# Altium PCB BOARD_2LAYER.PcbDoc (part 5 of 7)
Units mil, origin at the board's own origin, x right, y up, seen from the top; angles counter-clockwise.
Board outline 9842.52 x 9842.52 mil, 2 copper layers (Top Layer, Bottom Layer), stack 34.252 mil thick; 276 components, 129 nets, 793 pads, 303 vias.
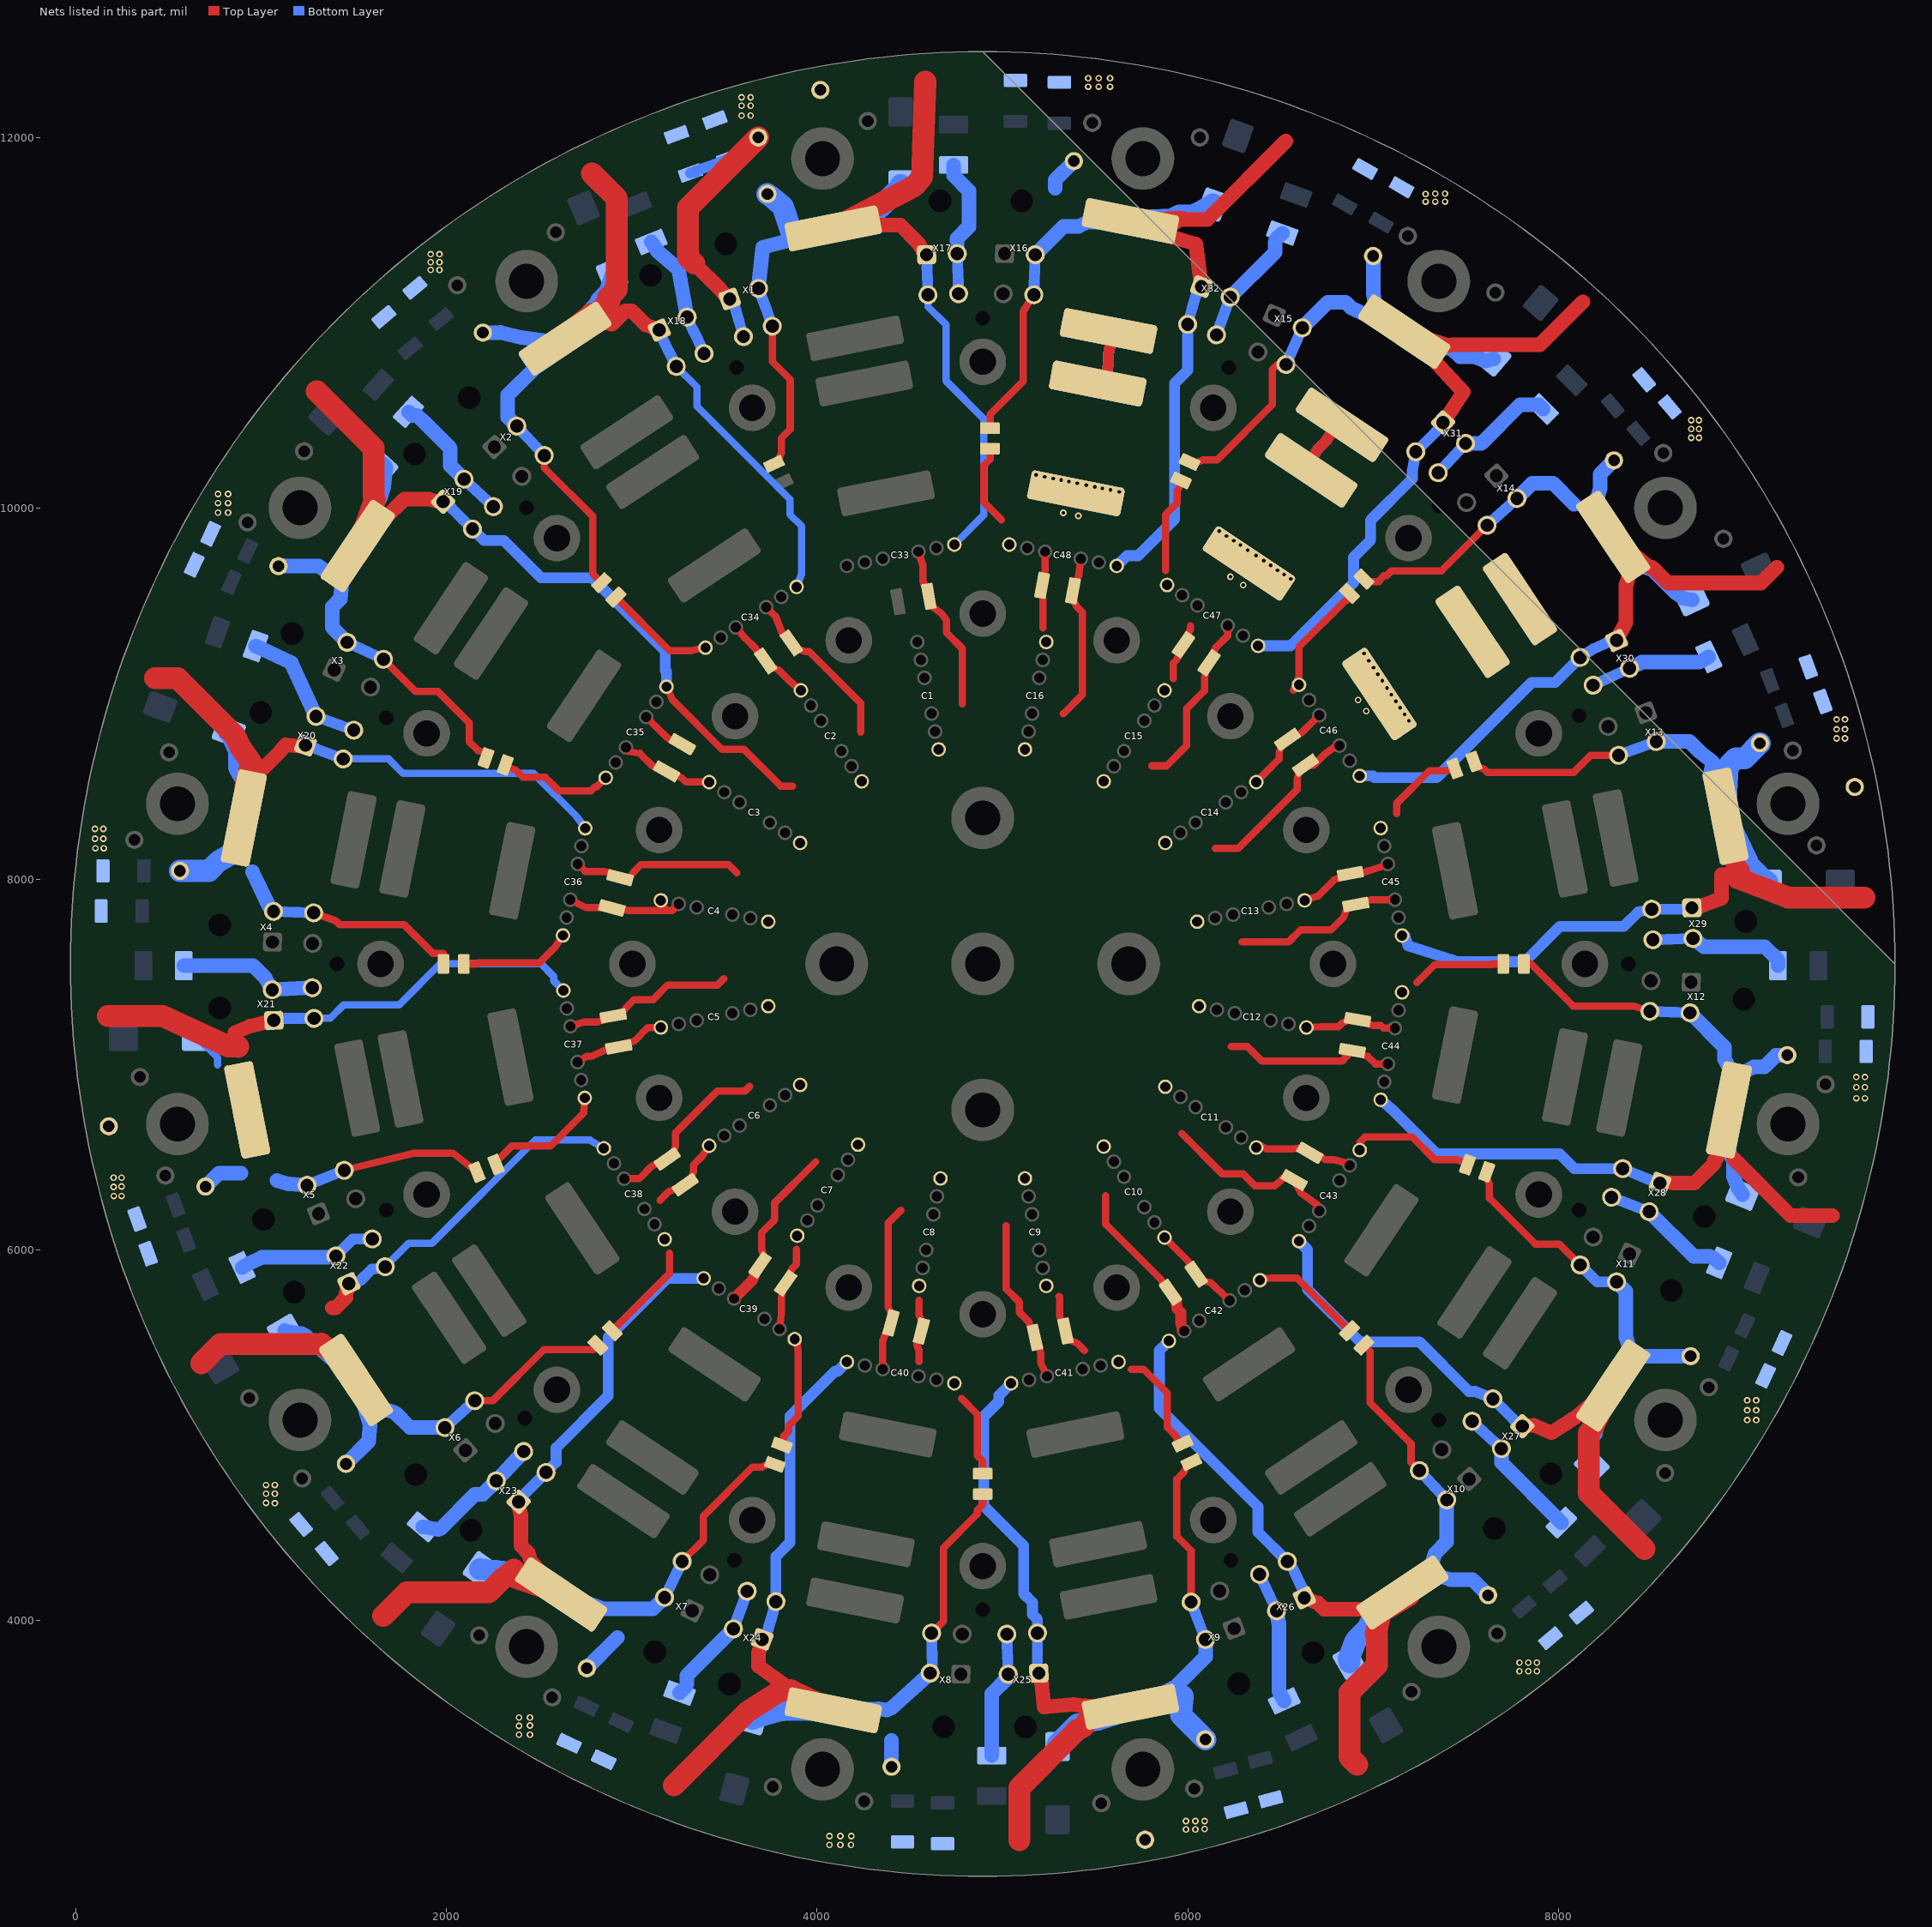
[diagram p5: the nets of this part, all layers, seen from the top]

## Via types
v1: diameter 35.43/35.43 (per signal layer), hole 19.68, Top Layer to Bottom Layer, 303 vias

## Nets (pads, with @x,y where several pads share a name; then routed paths per layer and width w, separated by ;. In a path a pad name is that pad's centre, name@x,y a point inside that pad or via, vN(x,y) a via of type N, cw(c..) or ccw(c..) an arc to the next point about the centre after c; other vN are vias at no path point) (continued)
$1N5582: L54.2 L55.1 | length 1238
  Top Layer w9.84: v1(6975.68,9179.13) 6975.68,9150.59 6984.54,9141.73 v1(7001.27,9141.73) ; v1(7048.51,9070.87) 7028.33,9050.68 7023.83,9046.19 7023.83,9009.11 L55.1@7033.49,8999.45 ; L55.1@7081.21,8841.54 7104.18,8841.54 7104.18,8928.76 L55.1@7033.49,8999.45 ; v1(7144.97,8925.2) L55.1@7144.97,8938.92 ; v1(7168.59,8889.76) L55.1@7192.21,8889.76 ; v1(7192.21,8854.33) L55.1@7192.21,8889.76 ; L55.1@7033.49,8999.45 7070.57,8999.45 7085.84,8984.18 v1(7097.72,8996.06) ; v1(7097.72,8996.06) 7116.23,8996.06 L55.1@7136.51,8975.79 ; v1(7097.72,8996.06) 7097.72,8984.25 v1(7121.35,8960.63) L55.1@7136.51,8975.79 ; L55.1@7136.51,8975.79 7136.51,8947.38 L55.1@7144.97,8938.92 ; L55.1@7144.97,8938.92 7192.21,8891.68 L55.1@7192.21,8889.76
  Bottom Layer w9.84: v1(6950.09,9218.5) 6989.46,9179.13 v1(6975.68,9179.13) ; v1(7001.27,9141.73) 7001.27,9113.19 7008.16,9106.3 v1(7024.89,9106.3) 7024.89,9079.47 7033.49,9070.87 v1(7048.51,9070.87) ; L54.2@7033.49,8999.45 L54.2@7070.6,8999.45 ; v1(7074.1,9031.5) 7074.1,9002.95 L54.2@7070.6,8999.45 ; v1(7097.72,8996.06) L54.2@7097.72,8999.45 ; v1(7192.21,8854.33) 7192.21,8889.76 v1(7168.59,8889.76) 7168.59,8925.2 v1(7144.97,8925.2) 7144.97,8960.63 v1(7121.35,8960.63) 7121.35,8989.17 7111.07,8999.45 L54.2@7097.72,8999.45 ; L54.2@7070.6,8999.45 L54.2@7097.72,8999.45
  other v1: 6961.9,8907.48 6918.59,8966.54
$1N5583: L55.2 L56.1
$1N5612: L57.2 L58.1 | length 313.4
  Bottom Layer w59.06: L58.1@6665.2,10205.97 6664.71,10265.44 6703.68,10323.77 6745.39,10365.48 6784.37,10423.82 L57.2@6831.42,10451.51
$1N5613: L58.2 L59.1 | length 1143
  Top Layer w9.84: v1(6207.96,9852.36) 6240.44,9819.88 v1(6247.33,9826.77) ; v1(6282.76,9803.15) 6274.82,9795.2 6274.82,9758.12 L59.1@6308.28,9724.66 ; v1(6322.13,9775.59) 6308.28,9761.74 L59.1@6308.28,9724.66 ; v1(6367.41,9746.06) 6338.87,9746.06 6329.46,9736.65 L59.1@6329.46,9703.48 ; v1(6446.15,9692.91) L59.1@6435.58,9703.48 ; v1(6483.55,9667.32) 6463.37,9687.51 6463.37,9696.52 6456.41,9703.48 L59.1@6435.58,9703.48 ; L59.1@6308.28,9724.66 L59.1@6329.46,9703.48 ; L59.1@6329.46,9703.48 6366.54,9703.48 6380.13,9689.89 v1(6408.75,9718.5) 6423.03,9704.23 6434.84,9704.23 L59.1@6435.58,9703.48
  Bottom Layer w9.84: L58.2@6158.75,9885.83 6166.62,9877.95 v1(6168.59,9877.95) 6176.46,9877.95 6202.05,9852.36 v1(6207.96,9852.36) ; v1(6282.76,9803.15) 6282.76,9805.12 6284.73,9807.09 6265.05,9826.77 v1(6247.33,9826.77) 6245.29,9824.73 6245.29,9787.65 L58.2@6308.28,9724.66 ; v1(6322.13,9775.59) 6308.28,9761.74 L58.2@6308.28,9724.66 ; v1(6367.41,9746.06) 6338.87,9746.06 6331.41,9738.61 6329.46,9736.65 L58.2@6329.46,9703.48 ; v1(6446.15,9692.91) L58.2@6435.58,9703.48 ; v1(6483.55,9667.32) 6463.37,9687.51 6463.37,9696.52 6456.41,9703.48 L58.2@6435.58,9703.48 ; L58.2@6308.28,9724.66 L58.2@6329.46,9703.48 ; L58.2@6329.46,9703.48 6366.54,9703.48 6380.13,9689.89 6388.56,9698.32 v1(6408.75,9718.5) 6423.03,9704.23 6434.84,9704.23 L58.2@6435.58,9703.48
  other v1: 6298.51,9586.61 6554.42,9620.08 6229.61,9631.89 6518.98,9643.7
$1N5614: L59.2 L60.1 | length 313.4
  Top Layer w59.06: L59.2@6665.2,10205.97 6664.71,10265.44 6703.68,10323.77 6745.39,10365.48 6784.37,10423.82 L60.1@6831.42,10451.51
$1N5643: L61.2 L62.1 | length 308
  Bottom Layer w59.06: L62.1@5512.97,10674.31 5558.55,10715.38 5572.24,10784.19 5572.24,10835.91 5585.93,10904.72 L61.2@5572.24,10957.58
$1N5644: L62.2 L63.1 | length 1121.1
  Top Layer w9.84: v1(5180.4,10181.1) 5180.4,10152.56 5227.65,10105.32 v1(5227.65,10171.26) ; v1(5272.92,10161.42) 5272.92,10132.87 5258.37,10118.33 5295.11,10081.59 5316.23,10081.59 v1(5316.23,10153.54) ; v1(5402.84,10135.83) 5402.84,10107.82 5395.07,10100.05 L63.1@5395.07,10081.59 5421.3,10107.82 5538.67,10107.82 v1(5538.67,10108.27)
  Bottom Layer w9.84: L62.2@5172.53,10187.01 5178.43,10181.1 v1(5180.4,10181.1) ; v1(5227.65,10171.26) 5216.54,10160.16 5272.92,10103.78 v1(5272.92,10161.42) ; v1(5316.23,10153.54) 5316.23,10107.82 5342.45,10081.59 L62.2@5395.07,10081.59 5421.3,10107.82 5452.05,10107.82 v1(5452.05,10125.98) 5461.9,10116.14 v1(5497.33,10116.14) ; v1(5357.57,10145.67) 5385.23,10145.67 5395.07,10135.83 v1(5402.84,10135.83) ; v1(5581.98,10100.39) 5581.98,10081.59 5591.72,10081.59 5600.68,10090.55 v1(5629.22,10090.55)
  other v1: 5408.75,9960.63 5328.04,9976.38
$1N5645: L63.2 L64.1 | length 308
  Top Layer w59.06: L63.2@5512.97,10674.31 5558.55,10715.38 5572.24,10784.19 5572.24,10835.91 5585.93,10904.72 L64.1@5572.24,10957.58
$1N5703: C2.2 C18.1 C34.2 R18.2 | length 1102.3
  Top Layer w39.37: R18.2@2914.26,9522.05 3202.13,9234.18 3321.02,9234.18 C34.2@3397.49,9249.34 ; 3561.16,9358.7 3561.16,9358.14 3572.22,9347.09 3611.18,9301.15 3667.92,9244.42 3700.68,9197.64 3724.78,9178.31 3724.3,9177.83 C18.1@3721.3,9177.83 3760.28,9142.69 3792.38,9128.93 3852.2,9069.11 C2.2@3912.02,9019.13
$1N5742: C3.2 C19.1 C35.2 R19.2 | length 1139.2
  Top Layer w39.37: R19.2@2316.84,8616.98 2325.69,8606.88 2373.22,8589.58 2412.82,8549.98 2534.36,8549.98 2606.59,8477.75 2779.38,8477.75 2799.23,8497.6 2808.68,8497.6 C35.2@2858.87,8547.79 ; 2968.24,8711.47 2968.24,8703.7 2983.55,8688.38 3043.08,8679.16 3109.3,8612.94 3124.03,8604.44 C19.1@3187.29,8582.21 3236.67,8565.45 3271.3,8545.45 3292.47,8524.28 C3.2@3417.17,8524.28
$1N5781: C4.2 C20.1 C36.2 R20.2 | length 1288.6
  Top Layer w39.37: R20.2@2093.79,7543.31 2161.49,7543.31 2167.73,7549.55 2502.42,7549.55 2585.05,7632.18 C36.2@2628.14,7697.13 ; 2668.23,7889.86 2676.89,7889.86 2686.73,7880.02 2751.73,7847.27 2840.3,7847.27 C20.1@2892.75,7845.4 2944.25,7840.02 2978.14,7830.94 3190.18,7830.94 ; C4.2@3156.55,7886.35 3156.55,7866.02 3190.18,7832.39 3190.18,7830.94 ; 3253.08,7867.14 3216.88,7830.94 3190.18,7830.94
$1N5819: C5.2 C21.1 C37.2 R21.2 | length 1197.6
  Top Layer w39.37: R21.2@2266.94,6461.59 2266.94,6494.26 2266.1,6495.09 2287.13,6495.09 2324.5,6532.46 2352.34,6560.3 2561.07,6560.3 2739.55,6738.79 2739.55,6742.94 C37.2@2745.88,6820.63 ; 2707.48,7013.7 2707.08,7013.31 2705.37,7013.31 2757.05,7044.24 2772.04,7044.24 2788.78,7047.19 2850.61,7076.09 2879.98,7081.27 C21.1@2929.35,7095.77 2977.67,7116.25 3014.07,7127.62 3086.71,7200.27 C5.2@3156.55,7200.27
$1N5825: C6.2 C22.1 C38.2 R22.2 | length 964.1
  Top Layer w39.37: R22.2@2894.57,5564.56 3202.13,5872.12 3202.13,5983.32 ; 3152.41,6268.17 3198.78,6314.54 3239.36,6332.23 C22.1@3288.01,6351.92 3323.15,6390.9 3333.8,6426.1 3333.8,6460.17 3372.26,6498.62 C6.2@3417.17,6562.33
$1N5831: C7.2 C23.1 C39.2 R23.2 | length 1082.7
  Top Layer w39.37: 3796.83,5573.71 3805.92,5651.13 3805.92,5737.68 3810.76,5772.88 C23.1@3830.45,5821.53 3850.14,5870.17 3867.83,5903.95 3887.02,5923.15 3887.02,6003.01 ; R23.2@3809.49,4947.46 3819.33,4957.31 3819.33,4996.68 3820.58,4996.68 3846.73,5022.83 3846.73,5053.06 3896.69,5103.02 3896.69,5451.34 3888.51,5528.87 C39.2@3878.67,5519.02
$1N5838: C8.2 C24.1 C40.2 R24.2 | length 800.2
  Top Layer w39.37: 4549.63,5397.28 4549.63,5457.26 4537.54,5492.15 4552.92,5542.32 4559.15,5548.56 4559.15,5555.7 4562.97,5559.51 4562.97,5564.34 C24.1@4561.38,5562.74 4563.24,5615.18 4549.96,5648.4 4549.96,5728.9 ; 4778.34,5199.43 4863.47,5114.3 4863.47,4891.31 4893,4861.78 R24.2@4893,4793.31
$1N5964: C9.2 C25.1 C41.2 R25.2 | length 907.4
  Top Layer w39.37: 5304.51,5750.55 5307.47,5747.59 5307.47,5647.93 5317.82,5610.45 C25.1@5339.97,5562.87 5362.12,5515.3 5401.3,5498.42 5442.52,5457.2 ; 5695.43,5355.83 5761.98,5355.83 5889.2,5228.61 5889.2,5042.55 5934.31,4997.44 5952.16,4959.17 R25.2@5972.07,4955.47
$1N5970: C10.2 C26.1 C42.2 R26.2 | length 1120.7
  Top Layer w39.37: C10.2@5873.98,6067.48 5998.62,5942.83 6019.05,5913.67 C26.1@6045.01,5869.42 6083.99,5834.28 6124.22,5823.62 6157.18,5790.66 6214.76,5738.11 6224.84,5728.03 6224.84,5727.91 ; C42.2@6388.51,5837.27 6378.67,5847.12 6450.73,5848.19 6588.12,5848.19 R26.2@6871.74,5564.56
$1N5976: C11.2 C27.1 C43.2 R27.2 | length 1238.4
  Top Layer w39.37: C11.2@6368.83,6552.49 6378.67,6562.33 6378.67,6570.95 6423.11,6545.28 6562.86,6545.28 6597.75,6549.31 6647.92,6533.94 C27.1@6657.76,6524.09 6707.14,6507.33 6741.77,6487.34 6787.4,6487.34 6862.6,6466.82 6872.44,6456.98 ; C43.2@6927.12,6538.82 6927.12,6581.38 6954.96,6609.22 7210.31,6609.22 7332.34,6487.2 7452.15,6487.2 7499.68,6469.9 R27.2@7508.53,6459.8
$1N5983: C12.2 C28.1 C44.2 R28.2 | length 1011.2
  Top Layer w39.37: C12.2@6639.29,7200.27 6717.12,7204.72 6812.72,7204.72 6830.73,7222.74 6863.16,7240.1 C28.1@6915.57,7242.81 6963.89,7222.34 7000.29,7210.96 7041.26,7210.96 7055.3,7196.93 7116.93,7196.93 ; 7234.12,7442.02 7332.84,7540.74 7642.4,7540.74 7644.97,7543.31 R28.2@7702.05,7543.31
$1N6109: C13.2 C29.1 C45.2 R29.2 | length 960.9
  Top Layer w39.37: C13.2@6629.45,7886.35 6703.61,7910.36 6791.61,7998.36 6828.01,8009.74 C29.1@6876.33,8030.21 6881.77,8030.21 6881.77,8026.39 6933.85,8032.82 6967.26,8043.52 7088.36,8082.75 ; 7126.36,8353.49 7126.36,8409.53 7301.4,8584.57 7397.92,8584.57 7413.91,8590.38 R29.2@7439.63,8597.29
$1N6115: C14.2 C30.1 C46.2 R30.2 | length 1199.8
  Top Layer w39.37: C14.2@6368.83,8524.28 6423.05,8580.29 6491.57,8648.81 6491.57,8680.2 6502.22,8715.4 C30.1@6537.36,8754.38 6586.01,8774.07 6617.48,8794.07 6623.75,8800.34 6678.87,8855.46 6708.4,8884.99 ; C46.2@6599.03,9048.66 6569.5,9019.13 6597.96,9091.71 6597.96,9252.21 6847.11,9501.36 6851.16,9501.36 6872.27,9522.47 6872.27,9541.21 R30.2@6871.74,9541.73
$1N6121: C15.2 C31.1 C47.2 R31.2 | length 824.8
  Top Layer w39.37: 5879.46,9666.45 5879.46,9967.04 5941.73,10029.31 5941.73,10091.59 5963.11,10137.43 R31.2@5962.23,10150.83 ; 5920.06,9081.94 5920.06,9164.87 5937.85,9182.66 5955.55,9216.44 C31.1@5975.24,9265.09 5994.93,9313.73 6012.62,9347.51 6012.62,9367.27 6013.15,9367.8
$1N6128: C16.2 C32.1 C48.2 R32.2 | length 849.9
  Top Layer w39.37: R32.2@4932.37,10322.83 4932.37,10265.75 4899.85,10233.22 4899.85,10033.1 4994.08,9938.86 ; 5217.76,9355.54 5217.76,9500.73 5215.9,9533.16 C32.1@5213.18,9585.56 5226.19,9650.19 5229.14,9666.94 5229.54,9767.23
$1N6933: R33.2 R34.2 TP17.1 X1.1 X1.3 | length 1785.3
  Top Layer w78.74: 3337.8,11321.03 3476.19,11182.64 3513.19,11137.58 X1.1@3528.28,11130.55
  Top Layer w118.11: 3337.8,11321.03 3302.37,11356.46 3302.37,11621.97 TP17.1@3682.37,12001.97
  Bottom Layer w59.06: R33.2@3316.53,11809.8 3349.28,11817.54 3340.74,11819.44 3443.78,11855.46 3483.9,11870.07 R34.2@3523.22,11888.54 3562.4,11907.4 3638.41,11932.39 TP17.1@3682.37,12001.97 ; X1.1@3528.28,11130.55 3554.2,11090.8 3560.02,11074.81 3576.83,11016.44 X1.3@3602.34,10927.07
D_CH-1: L1.1 R1.1 R17.1 TP1.1 X1.2 X1.4 | length 2622.1
  Top Layer w39.37: X1.4@3757.72,10983.63 3757.72,10792.5 3854.38,10695.84 3854.38,10427.74 3806.14,10379.49 3806.14,10300.14 3792.66,10265.69 R17.1@3767.34,10240.9
  Bottom Layer w59.06: X1.2@3683.66,11187.1 3725.69,11078.29 X1.4@3757.72,10983.63
  Bottom Layer w78.74: X1.2@3683.66,11187.1 3683.66,11196.94 3707.28,11409.06 L1.1@4102.34,11512.14 ; L1.1@4086.02,11510.93 L1.1@4095.4,11510.93
  Bottom Layer w118.11: TP1.1@3731.58,11696.85 3751.56,11682.14 3815.97,11628.21 3820.52,11610.92 3867.62,11471.03 4095.4,11510.93 4095.96,11511.02 4102.34,11512.14 4261.13,11556.92 4347.51,11631.68 4450.09,11734.25 R1.1@4450.09,11746.06
D_CH-2: L5.1 R2.1 R18.1 TP2.1 X2.2 X2.4 | length 2535.4
  Top Layer w39.37: X2.4@2527.3,10286.26 2527.3,10220.27 2788.36,9959.21 2788.36,9647.94 R18.1@2836.31,9600
  Bottom Layer w59.06: X2.2@2379.63,10444.62 2485.02,10331.61 X2.4@2527.3,10286.26
  Bottom Layer w78.74: TP2.1@2196.15,10948.82 2290.64,10948.82 2291.3,10949.48 2404.72,10922.53 2583.84,10897.48 L5.1@2638.51,10914.63 ; X2.2@2379.63,10444.62 2330.74,10493.51 2330.74,10612.04 2374.61,10655.9 2440.36,10721.65 2480.35,10761.65 L5.1@2638.51,10914.63 ; R2.1@2893.14,11259.74 2863.13,11174.05 2852.05,11162.77 2814.75,11125.48 2808,11108.48 L5.1@2638.51,10914.63
D_CH-3: L9.1 R3.1 R19.1 TP3.1 X3.2 X3.4 | length 2322.9
  Top Layer w39.37: X3.4@1659.92,9186.66 1833.8,9012.78 1953.8,9012.78 2123.27,8843.31 2123.27,8741.92 2169.99,8695.2 2210.15,8680.58 R19.1@2213.25,8654.68
  Bottom Layer w59.06: X3.2@1463.67,9278.17 X3.4@1659.92,9186.66
  Bottom Layer w78.74: TP3.1@1093.79,9688.98 1310.83,9688.98 1373.63,9647.01 L9.1@1521.68,9797.8 1434.1,9595.93 1426.91,9512.79 1383.47,9469.35 1383.47,9358.37 X3.2@1463.67,9278.17
  Bottom Layer w118.11: 1623.56,10062.33 1642.02,10119.79 1652.4,10211.43 1652.4,10217.77 R3.1@1643.62,10226.55
D_CH-4: L13.1 R4.1 R20.1 TP4.1 X4.2 X4.4 | length 2306.5
  Top Layer w39.37: X4.4@1283.61,7819.01 1403.67,7775.78 1424.28,7755.17 1771.68,7755.17 1926.46,7600.39 1983.55,7600.39 R20.1@1983.55,7543.31
  Bottom Layer w59.06: X4.2@1067.21,7826.56 X4.4@1283.61,7819.01
  Bottom Layer w78.74: 953.67,8040.2 1045.3,7848.47 X4.2@1067.21,7826.56
  Bottom Layer w118.11: TP4.1@562.29,8045.28 718.65,8045.28 771.18,8097.8 848.03,8141.41 L13.1@905.7,8330.6 924.82,8527.47 881.22,8604.32 881.22,8696.15 841.79,8780.8 R4.1@826.01,8794.88
D_CH-5: L17.1 R5.1 R21.1 TP5.1 X5.2 X5.4 | length 1560.3
  Top Layer w39.37: X5.4@1448.63,6430.21 1822.32,6522.19 2036.24,6522.19 R21.1@2164.73,6420.3
  Bottom Layer w39.37: R5.1@650.87,7139.76 662.68,7139.76 766.33,7036.12 766.33,6998.24
  Bottom Layer w59.06: X5.2@1247.86,6349.09 X5.4@1448.63,6430.21
  Bottom Layer w78.74: TP5.1@700.09,6342.52 772.49,6414.92 890.57,6414.92 ; 1086.42,6374.12 1149.4,6356.1 X5.2@1247.86,6349.09
D_CH-6: L21.1 R6.1 R22.1 TP6.1 X6.2 X6.4 | length 2582.4
  Top Layer w39.37: X6.4@2152.39,5187.04 2249.95,5187.04 2526.22,5463.31 2793.31,5463.31 R22.1@2816.62,5486.62
  Bottom Layer w9.84: L21.1@1511.84,5298.66 1511.84,5298.55 1511.04,5297.75 1511.23,5297.75 1512.53,5296.45 L21.1@1521.95,5288.21
  Bottom Layer w59.06: X6.2@1991.47,5042.15 X6.4@2152.39,5187.04
  Bottom Layer w78.74: R6.1@1126.47,5564.96 1216.65,5548.23 1234.76,5541.12 1300.99,5474.9 1318.04,5468.28 L21.1@1511.84,5298.66 ; TP6.1@1457.96,4846.46 1581.33,4969.83 1583.94,5003.52 1588.09,5055.92 L21.1@1512.53,5296.45 ; L21.1@1521.95,5288.21 1664.82,5140.5 1722.69,5122.42 1802.97,5042.15 X6.2@1991.47,5042.15
D_CH-7: L25.1 R7.1 R23.1 TP7.1 X7.2 X7.4 | length 2311.7
  Top Layer w39.37: X7.4@3271.66,4320.56 3386.95,4435.85 3386.95,4564.78 3651.59,4829.42 3702.46,4829.42 3736.35,4844.25 R23.1@3771.79,4843.88
  Bottom Layer w59.06: X7.2@3176.74,4125.94 X7.4@3271.66,4320.56
  Bottom Layer w78.74: L25.1@2609.09,4149.24 2848.47,4063.97 3114.77,4063.97 X7.2@3176.74,4125.94 ; TP7.1@2757.17,3744.09 2921.86,3908.79
  Bottom Layer w118.11: R7.1@2181.11,4279.36 2249.79,4269.41 2266.57,4268.34 2346.06,4259.66 2352.76,4252.95 2369.57,4245.74 2609.09,4149.24 2615.88,4142.46 L25.1@2618.83,4142.46
D_CH-8: L29.1 R8.1 R24.1 TP8.1 X8.2 X8.4 | length 2279.5
  Top Layer w39.37: X8.4@4617.3,3933.92 4681.03,3997.65 4681.03,4392.98 4863.47,4575.42 4863.47,4596.46 4893,4625.98 R24.1@4893,4683.07
  Bottom Layer w59.06: X8.2@4609.74,3717.52 4621.56,3729.34 4621.56,3746.05 X8.4@4617.3,3933.92
  Bottom Layer w78.74: L29.1@4071.87,3519.8 4328.95,3525.67 4375.05,3518.2 4403.68,3531.22 X8.2@4609.74,3717.52 ; TP8.1@4400.87,3212.6 4400.87,3354.8
  Bottom Layer w118.11: R8.1@3654.58,3471.64 3724.83,3495.76 3797.87,3515.15 3813.77,3517.7 4071.87,3519.8 4082.85,3519.8 L29.1@4086.02,3516.63
D_CH-9: L33.1 R9.1 R25.1 TP9.1 X9.2 X9.4 | length 2676.3
  Top Layer w39.37: X9.4@6017.17,4100.98 6017.17,4378.17 5940.17,4455.17 5940.17,4763 5976.67,4799.5 5993.34,4830.76 R25.1@6018.66,4855.56
  Bottom Layer w59.06: X9.4@6017.17,4100.98 X9.2@6094.77,3898.82
  Bottom Layer w78.74: L33.1@5703.85,3527.27 5933.11,3644.53 5944.61,3655.32 6094.77,3805.48 X9.2@6094.77,3898.82
  Bottom Layer w118.11: R9.1@5296.54,3320.87 5296.54,3332.68 5404.79,3440.93 5515.43,3467.14 L33.1@5703.85,3527.27 ; L33.1@5690.14,3536.32 5690.14,3526.48 5699.98,3526.48 5700.78,3527.27 L33.1@5703.85,3527.27 ; TP9.1@6093.79,3360.24 5962.87,3491.15 5973.06,3592.59 L33.1@5703.85,3527.27
D_CH-10: L37.1 R10.1 R26.1 TP10.1 X10.2 X10.4 | length 2619.6
  Top Layer w39.37: R26.1@6949.69,5486.62 6983.96,5452.35 6983.96,5175.18 7203.8,4955.34 7203.8,4855.25 X10.4@7248.85,4810.2
  Bottom Layer w59.06: X10.4@7248.85,4810.2 X10.2@7396.53,4651.83
  Bottom Layer w78.74: X10.2@7396.53,4651.83 7396.53,4426.11 7333.57,4363.15 7315.49,4305.28 L37.1@7157.33,4152.3 7359.19,4239.88 7417.06,4221.8 7535.37,4221.8 TP10.1@7619.38,4137.8
  Bottom Layer w118.11: R10.1@6871.35,3776.78 6868.31,3797.71 6905.66,3893.97 6967.11,3955.43 7004.6,4026.62 L37.1@7157.33,4152.3
D_CH-11: L41.1 R11.1 R27.1 TP11.1 X11.2 X11.4 | length 2562.3
  Top Layer w39.37: R27.1@7612.12,6422.09 7611.75,6386.66 7626.58,6352.77 7626.58,6280.21 7874.03,6032.76 8003.12,6032.76 X11.4@8116.23,5919.64
  Bottom Layer w59.06: X11.4@8116.23,5919.64 8207.75,5828.13 X11.2@8312.48,5828.13
  Bottom Layer w78.74: R11.1@8179,4838.01 8179,4988.12 8199.07,5008.19 8199.07,5009.4 8206.27,5067.27 L41.1@8293.85,5269.13 ; X11.2@8312.48,5828.13 8363.34,5777.27 8363.34,5528.86 8381.42,5470.99 L41.1@8293.85,5269.13 ; TP11.1@8711.9,5427.17 8504.7,5427.17 8446.83,5427.29 L41.1@8293.85,5269.13
D_CH-12: L45.1 R12.1 R28.1 TP12.1 X12.2 X12.4 | length 2565.7
  Top Layer w39.37: R28.1@7812.29,7543.31 7851.22,7543.31 8077.94,7316.59 8405.2,7316.59 X12.4@8492.54,7287.29
  Bottom Layer w59.06: X12.4@8492.54,7287.29 X12.2@8708.95,7279.74
  Bottom Layer w78.74: X12.2@8708.95,7279.74 8895.2,7093.48 8895.2,7029.73 8923.34,6976.02 L45.1@8919.67,6756.01 ; R12.1@8991.98,6298.15 8965.82,6338.4 8944.15,6395.78 8944.15,6482.3 8916.01,6536 L45.1@8919.67,6756.01 ; TP12.1@9233.55,7051.18 9173.24,7051.18 9110.87,6988.81 9054.19,6988.81 9000.49,6960.67 L45.1@8919.67,6756.01
D_CH-13: L49.1 R13.1 R29.1 TP13.1 X13.2 X13.4 | length 2667.1
  Top Layer w39.37: R29.1@7543.22,8634.99 7565.71,8607.61 7599.6,8592.78 7616.5,8575.88 8080.87,8575.88 8173.73,8668.74 X13.4@8323.48,8668.74
  Bottom Layer w9.84: L49.1@8816.23,8550.65 8806.64,8560.25 8814.19,8560.25 L49.1@8818.26,8564.31
  Bottom Layer w59.06: X13.4@8323.48,8668.74 X13.2@8526.95,8742.8
  Bottom Layer w78.74: X13.2@8526.95,8742.8 8706.12,8742.8 8761.8,8687.13 8831.6,8630.87 8816.23,8550.65 8815.71,8547.91 L49.1@8899.19,8344.32
  Bottom Layer w118.11: L49.1@8899.99,8340.45 8899.19,8341.24 L49.1@8899.19,8344.32 ; TP13.1@9085.91,8734.25 9005.18,8653.52 8955.83,8653.52 8920.48,8618.17 8913.06,8601.45 L49.1@8899.19,8344.32 ; R13.1@9125.28,7986.22 9113.47,7986.22 9018.71,8080.98 9018.71,8095.03 9011.36,8111.8 L49.1@8899.19,8344.32
D_CH-14: L53.1 R14.1 R30.1 TP14.1 X14.2 X14.4 | length 2430.1
  Top Layer w39.37: R30.1@6949.69,9619.68 6965,9604.37 7031.87,9604.37 7031.87,9611.39 7057.3,9636.81 7071.15,9636.81 7098.28,9663.94 7368.45,9663.94 X14.4@7613.93,9909.42
  Bottom Layer w59.06: X14.4@7613.93,9909.42 X14.2@7774.84,10054.31
  Bottom Layer w78.74: X14.2@7774.84,10054.31 7857.83,10137.29 7968.95,10137.29 8083,10023.25 ; TP14.1@8298.51,10259.84 8224.35,10185.68 8224.35,10106.74 8206.27,10048.87 L53.1@8293.85,9847.01 8446.83,9688.85 8504.7,9670.77 8626.27,9549.2 8673.22,9515.68 R14.1@8720.5,9507.36
D_CH-15: L57.1 R15.1 R31.1 TP15.1 X15.2 X15.4 | length 2711.6
  Top Layer w39.37: R31.1@6008.81,10250.74 6044.08,10247.28 6079.88,10262.11 6157.83,10262.11 6454.71,10558.99 6454.71,10749.07 6482.55,10776.91 X15.4@6528.82,10776.91
  Bottom Layer w59.06: X15.4@6528.82,10776.91 X15.2@6616.9,10974.73
  Bottom Layer w78.74: X15.2@6616.9,10974.73 6754.17,11112 6850.85,11112 6878.71,11084.14 6965.31,11041.57 L57.1@7167.17,10954 ; TP15.1@6999.3,11362.2 6999.3,11164.85 7009.01,11106.98 7076.63,11041.57 L57.1@7167.17,10954 ; R15.1@7650.32,10807.87 7603.96,10795.43 7544.05,10819.05 7467.08,10819.05 7426.9,10859.22 7369.03,10866.42 L57.1@7167.17,10954
D_CH-16: L61.1 R16.1 R32.1 TP16.1 X16.2 X16.4 | length 2269.6
  Top Layer w39.37: R32.1@4932.37,10433.07 4932.37,10507.83 5111.49,10686.95 5111.49,11063.27 X16.4@5168.7,11152.69
  Bottom Layer w59.06: X16.4@5168.7,11152.69 X16.2@5176.26,11369.1
  Bottom Layer w78.74: X16.2@5176.26,11369.1 5328.89,11521.73 5410.26,11521.73 5452.22,11542.39 5683.66,11551.51 5688.92,11551.51 L61.1@5690.14,11550.3 ; 5282.89,11728.54 5282.89,11771.78 TP16.1@5385.13,11874.02
  Bottom Layer w118.11: L61.1@5683.66,11551.51 5915.1,11560.63 5957.06,11581.29 6032.67,11581.29 6038.51,11587.13 6055.21,11593.83 R16.1@6134.73,11639.82
OUT_CH-1: L65.2 X17.2 X17.4 | length 755.3
  Bottom Layer w59.06: X17.2@4755.31,11374.87 X17.4@4762.87,11158.46
  Bottom Layer w78.74: L65.2@4735.52,11853.35 4735.52,11796.49 4818.2,11713.82 4818.2,11520.39 4755.31,11457.51 X17.2@4755.31,11374.87
OUT_CH-2: L66.2 X18.2 X18.4 | length 689
  Bottom Layer w59.06: X18.2@3298.16,11032.67 3328.9,10965.54 3348.62,10927.48 X18.4@3389.67,10836.42
  Bottom Layer w78.74: L66.2@3104.1,11438.43 3140.64,11385.24 3251.49,11290.51 X18.2@3298.16,11032.67
OUT_CH-3: L67.2 X19.2 X19.4 | length 720.8
  Bottom Layer w59.06: X19.2@2094.61,10157.93 X19.4@2252.98,10010.25
  Bottom Layer w78.74: L67.2@1795.06,10521.38 1814.74,10501.7 1839.54,10502.83 1873.02,10472.69 2021.12,10324.59 2021.12,10231.42 X19.2@2094.61,10157.93
OUT_CH-4: L68.2 X20.2 X20.4 | length 747.5
  Bottom Layer w59.06: X20.2@1295.92,8878.5 X20.4@1499.39,8804.44
  Bottom Layer w78.74: L68.2@970.07,9257.91 1162.09,9167.71 1163.68,9166.17 X20.2@1295.92,8878.5
OUT_CH-5: L69.2 X21.2 X21.4 | length 757.6
  Bottom Layer w78.74: L69.2@582.96,7533.46 956.78,7533.46 1022.41,7467.84 X21.2@1060.08,7403.67 X21.4@1276.32,7415
OUT_CH-6: L70.2 X22.2 X22.4 | length 755.1
  Bottom Layer w59.06: X22.2@1403.64,5968.15 1495.15,6059.66 X22.4@1599.88,6059.66
  Bottom Layer w78.74: L70.2@897.53,5906.41 934.15,5927.93 1005.05,5961 1389.2,5961 X22.2@1403.64,5968.15
OUT_CH-7: L71.2 X23.2 X23.4 | length 720.9
  Bottom Layer w78.74: L71.2@1872.67,4506.92 1955.07,4492.37 1970.97,4499.27 2152.96,4681.27 2195.04,4681.27 X23.2@2268.54,4754.76 X23.4@2416.21,4913.13
OUT_CH-8: L72.2 X24.2 X24.4 | length 681.4
  Bottom Layer w59.06: X24.2@3547.96,3956.07 X24.4@3622.02,4159.54
  Bottom Layer w78.74: L72.2@3257.14,3610.54 3290.65,3643.34 3296.47,3659.32 3296.47,3704.57 X24.2@3547.96,3956.07
OUT_CH-9: L73.2 X25.2 X25.4 | length 692.3
  Bottom Layer w59.06: X25.4@5023.13,3928.15 X25.2@5030.69,3711.75
  Bottom Layer w78.74: L73.2@4942.21,3272.64 4942.21,3606.56 5030.69,3695.03 X25.2@5030.69,3711.75
OUT_CH-10: L74.2 X26.2 X26.4 | length 711.6
  Bottom Layer w59.06: X26.4@6386.49,4250.19 X26.2@6478,4053.94
  Bottom Layer w78.74: X26.2@6478,4053.94 6491.34,3980.74 6491.34,3619.55 6498.53,3604.14 L74.2@6520.06,3567.52
OUT_CH-11: L75.2 X27.2 X27.4 | length 749.1
  Bottom Layer w59.06: X27.4@7533.02,5076.36 X27.2@7691.39,4928.69
  Bottom Layer w78.74: X27.2@7691.39,4928.69 7691.39,4853.19 L75.2@8014.57,4530.01
OUT_CH-12: L76.2 X28.2 X28.4 | length 706.6
  Bottom Layer w59.06: X28.4@8285.92,6284.45 X28.2@8488.07,6206.85
  Bottom Layer w78.74: X28.2@8488.07,6206.85 8729.12,5965.8 8816.74,5965.8 8832.51,5959.43 L76.2@8866.51,5930.69
OUT_CH-13: L77.2 X29.2 X29.4 | length 751.4
  Bottom Layer w59.06: X29.4@8508.16,7673.44 X29.2@8724.56,7680.99
  Bottom Layer w78.74: X29.2@8724.56,7680.99 8783.83,7636.01 9112.31,7636.01 9183.35,7564.96 L77.2@9183.35,7533.46
OUT_CH-14: L78.2 X30.2 X30.4 | length 659.1
  Bottom Layer w59.06: X30.4@8186.12,9046.64 X30.2@8382.36,9138.15
  Bottom Layer w78.74: X30.2@8382.36,9138.15 8449.04,9171.18 8757.7,9171.18 8773.11,9178.37 L78.2@8809.73,9199.89
OUT_CH-15: L79.2 X31.2 X31.4 | length 730.1
  Bottom Layer w59.06: X31.4@7350.1,10193.17 X31.2@7497.78,10351.54
  Bottom Layer w78.74: X31.2@7497.78,10351.54 7583.99,10351.54 7791.65,10559.19 7893.87,10559.19 L79.2@7916.14,10536.92
OUT_CH-16: L80.2 X32.2 X32.4 | length 677.3
  Bottom Layer w59.06: X32.4@6154.13,10936.91 X32.2@6228.19,11140.39
  Bottom Layer w78.74: X32.2@6228.19,11140.39 6469.85,11382.05 6469.85,11437.14 6475.67,11453.12 L80.2@6509.18,11485.92
~OUT: C1.1 C2.1 C3.1 C4.1 C5.1 C6.1 C7.1 C8.1 C9.1 C10.1 C11.1 C12.1 C13.1 C14.1 C15.1 C16.1 C17.2 C18.2 C19.2 C20.2 C21.2 C22.2 C23.2 C24.2 C25.2 C26.2 C27.2 C28.2 C29.2 C30.2 C31.2 C32.2 C33.1 C34.1 C35.1 C36.1 C37.1 C38.1 C39.1 C40.1 C41.1 C42.1 C43.1 C44.1 C45.1 C46.1 C47.1 C48.1 L4.2 L8.2 L12.2 L16.2 L20.2 L24.2 L28.2 L32.2 L36.2 L40.2 L44.2 L48.2 L52.2 L56.2 L60.2 L64.2 R33.1 R34.1 R35.1 R36.1 R37.1 R38.1 R39.1 R40.1 R41.1 R42.1 R43.1 R44.1 R45.1 R46.1 R47.1 R48.1 R49.1 R50.1 R51.1 R52.1 R53.1 R54.1 R55.1 R56.1 R57.1 R58.1 R59.1 R60.1 R61.1 R62.1 R63.1 R64.1 TP49.1 TP50.1 TP51.1 TP52.1 X17.1 X17.3 X18.1 X18.3 X19.1 X19.3 X20.1 X20.3 X21.1 X21.3 X22.1 X22.3 X23.1 X23.3 X24.1 X24.3 X25.1 X25.3 X26.1 X26.3 X27.1 X27.3 X28.1 X28.3 X29.1 X29.3 X30.1 X30.3 X31.1 X31.3 X32.1 X32.3 | length 68637.6
  Top Layer w9.84: C27.2@6573.12,6377.48 6573.12,6344.42 6608.92,6308.62 ; L48.2@8914.1,6741.89 8913.18,6755.58 L48.2@8919.67,6756.01
  Top Layer w39.37: 2669.07,7206.77 2743.28,7230.64 2815.24,7230.64 2851.63,7242.02 C21.2@2899.95,7262.49 2948.28,7282.97 2971.32,7309.71 3012.51,7350.9 3115.03,7350.9 3193.42,7429.29 3462.13,7429.29 3497.15,7464.3 ; 2708.32,8082.58 2748.56,8042.34 2851.17,8042.34 2889.8,8031.99 C20.2@2936.56,8008.93 2989.01,8007.06 3008.06,8037.35 3050.06,8079.36 3522.03,8079.36 3565.72,8035.67 ; 2958.4,6384.99 3040.25,6384.99 3108.48,6453.21 3142.26,6470.91 C22.2@3190.91,6490.6 ; 3077.6,8875.14 3133.1,8820.4 3187.93,8765.57 3222.56,8745.58 C19.2@3271.94,8728.82 ; C35.1@3186.97,9038.82 3219.6,8968.02 3487.16,8700.46 3605.78,8700.46 3803.4,8502.84 3866.65,8502.84 ; 3636.06,6883.23 3610.43,6857.59 3460.89,6857.59 3236.7,6633.41 3236.7,6564.78 3226.05,6529.57 C22.2@3190.91,6490.6 ; C23.2@3691.77,5918.63 3711.46,5967.27 3700.81,6002.48 3700.81,6029.4 3699.89,6030.32 3699.89,6092.37 3770.15,6162.63 3770.15,6254.03 3992.92,6476.8 ; 3724.84,9468.07 3724.84,9477.91 3734.68,9477.91 3734.68,9458.79 3776.06,9417.4 3807.33,9334.3 3822.84,9315.15 3858.71,9271.36 C18.2@3859.98,9274.93 3898.95,9239.79 3934.16,9229.13 3955.6,9229.13 4233.9,8950.82 4233.9,8793.24 ; 4353.55,5357.78 4353.55,5510.28 4373.25,5560.2 C24.2@4397.85,5606.55 4399.72,5659 4382.86,5692.95 4382.86,6145.76 4451.45,6214.36 ; 4546.62,9767.23 4570.49,9693.03 4570.49,9611.23 4581.87,9574.83 C17.2@4602.34,9526.51 4622.82,9478.19 4627.55,9465.89 4627.55,9465.48 4669.15,9434.97 4698.31,9395.86 4698.31,9329.73 4783.36,9244.68 4783.36,8946.18 ; 5019.82,6132.07 5019.82,5790.36 5090.49,5719.7 5090.49,5664.12 5141.88,5612.73 5152.23,5575.25 C25.2@5174.38,5527.68 5196.52,5480.1 5206.88,5442.62 5206.88,5390.24 5239.38,5319.38 ; 5327.14,8892.05 5430.82,8995.73 5430.82,9440.49 5399.97,9471.33 5382.61,9503.76 C32.2@5379.9,9556.17 5400.38,9604.49 5411.75,9640.89 5411.75,9651.64 5422.6,9728.83 ; 5556.66,6291.92 5556.66,6139.14 5852.82,5842.98 5874.3,5812.31 C26.2@5906.34,5772.32 5910.83,5767.82 C26.2@5910.83,5766.46 ; 5804.59,8611.97 5884.86,8611.97 5993.01,8720.12 5993.01,8920.35 6089.39,9016.72 6089.39,9084.13 6094.22,9119.34 C31.2@6113.91,9167.98 6133.6,9216.63 6151.3,9250.41 6214.99,9314.11 6214.99,9368.55 ; 5966.38,6629.52 6184.95,6410.95 6297.09,6410.95 6360.67,6347.37 6468.16,6347.37 6471.37,6350.57 6488.51,6363.39 C27.2@6515.37,6390.24 ; 6147.66,8165.66 6270.53,8165.66 6588.67,8483.8 6588.67,8541.52 6599.32,8576.73 C30.2@6634.46,8615.7 6640.6,8621.84 6651.37,8621.84 6657.5,8615.7 6679.51,8615.7 6739.96,8676.16 6788.59,8711.71 6798.19,8721.31 6817.76,8721.31 ; 6232.72,7098.02 6320.43,7098.02 6399.13,7019.32 6832.23,7019.32 6859.36,7046.45 C28.2@6835.81,7073.48 ; 6292.13,7662.39 6543.58,7662.39 6607.64,7726.45 6770.55,7726.45 6840.05,7795.95 6857.41,7843.02 C29.2@6905.73,7863.49 6954.17,7883.29 6990.45,7889.69 7116.93,7889.69 ; 6708.4,6211.47 6698.55,6221.31 6698.44,6221.31 6698.2,6221.55 6698.2,6244.38 6608.92,6308.62 C27.2@6573.12,6377.48 ; 7078.52,7003.86 7011.27,7003.86 6970.89,7044.24 6934.5,7055.62 C28.2@6886.18,7076.09 6885.78,7075.69 C28.2@6878.56,7075.7 ; C22.2@3165.95,6465.64 C22.2@3190.91,6490.6 ; C22.2@3165.95,6465.64 C22.2@3190.91,6490.6 ; C22.2@3165.95,6465.64 3165.67,6465.36 3168.16,6465.36 C22.2@3190.91,6490.6 ; C27.2@6515.37,6390.24 C27.2@6516.14,6390.24 ; C27.2@6515.37,6390.24 C27.2@6515.86,6390.13 ; C27.2@6515.86,6390.13 C27.2@6516.14,6390.24 ; C27.2@6515.86,6390.13 C27.2@6573.12,6377.48 ; C27.2@6516.14,6390.24 C27.2@6522.94,6392.86 ; C27.2@6516.14,6390.24 6520.32,6390.24 C27.2@6522.94,6392.86 ; C27.2@6522.94,6392.86 C27.2@6573.12,6377.48 ; C28.2@6835.81,7073.48 6876.35,7073.48 C28.2@6878.56,7075.7 ; C28.2@6835.81,7073.48 6838.02,7075.7 C28.2@6878.56,7075.7
  Top Layer w59.06: 3551.32,5737.75 3652.08,5838.51 3669.66,5883.69 C23.2@3691.77,5918.63 ; C26.2@5910.83,5766.46 5935.9,5733.58 5940.98,5684.32 5961.92,5663.38 5961.92,5602.35 5969.87,5573.32 5979.32,5563.86
  Top Layer w78.74: 876.17,7096.84 860.08,7173.95 939.19,7206.93 X21.1@1068.73,7238.54 ; L16.2@905.7,8330.6 915.63,8503.09 1103.47,8690.93 1131.92,8726.07 1224.27,8716.08 1232.33,8716.08 X20.1@1239.36,8723.12 ; 1384.47,5688.34 1401.98,5688.34 1458.26,5744.63 1457.57,5760.47 X22.1@1473.52,5818.29 ; L24.2@1509.7,5319.2 1511.84,5319.2 L24.2@1511.84,5298.66 ; L12.2@1521.68,9797.8 1521.68,9800.75 1528.46,9807.53 1672.32,9951.38 1673.32,9951.38 1771.69,10049.75 1905.19,10049.75 1965.2,10036.41 X19.1@1981.84,10036.99 ; X23.1@2389.47,4641.99 2390.54,4611.44 2402.23,4565.34 2402.23,4404.21 2440.06,4366.38 2454.88,4322.06 2609.09,4149.24 2615.88,4142.46 L28.2@2618.83,4142.46 ; L8.2@2630.87,10925.92 2694.22,10925.92 L8.2@2740.77,10972.47 ; L8.2@2782.13,11048.19 2799.31,11031.01 L8.2@2740.77,10972.47 ; X24.1@3703.35,3899.51 3704.49,3886.57 3683,3827.52 3683,3755.57 L32.2@3863.87,3625.31 ; L32.2@4086.02,3516.63 4082.85,3519.8 L32.2@4071.87,3519.8 ; L4.2@4086.02,11510.93 4103.82,11528.73 4120.12,11528.73 4448.47,11528.73 4544.88,11432.32 4577.88,11380.45 X17.1@4590.06,11369.1 ; X25.1@5195.94,3717.52 5211.09,3658.68 5222.86,3535.15 5382.94,3548.56 5409.95,3544.33 5446.99,3541.78 L36.2@5703.85,3527.27 ; 5975.72,11562.9 L64.2@5951.98,11562.9 ; X32.1@6072.81,11196.94 6043.48,11427.22 5894.8,11469.49 L64.2@5690.14,11550.3 5946.85,11568.04 5932.81,11542.8 L64.2@5951.98,11562.9 ; 6527.55,11981.44 6104.6,11558.49 5956.4,11558.49 L64.2@5951.98,11562.9 ; X26.1@6627.86,4123.82 6643.5,4118.13 6701.52,4095.68 6735.34,4061.86 6934.41,4061.86 6992.4,4044.38 7192.3,4136.34 7172.61,4156.02 7161.05,4156.02 L40.2@7157.33,4152.3 ; X31.1@7376.84,10464.31 7485.93,10628.09 7325.33,10801.02 L60.2@7167.17,10954 7409.85,10877.88 7426.9,10884.5 7900.23,10884.5 8130.48,11114.75 ; X27.1@7804.16,5049.62 7864.32,5055.19 7961.11,5014.41 8071.87,5085.88 8092.75,5098.17 L44.2@8290.13,5263.69 ; X30.1@8312.48,9288.01 8318.18,9303.65 8363.34,9384.39 8363.34,9587.28 8381.42,9645.15 L56.2@8293.85,9847.01 8488.91,9683.41 8504.7,9683.1 8589.24,9598.56 9092.03,9598.56 9176.56,9683.1 ; X28.1@8547.33,6361.22 8562.54,6367.99 8619.68,6361.22 8733.38,6361.22 8838.86,6466.7 8838.86,6482.67 8852,6495.81 8852,6548.73 L48.2@8919.67,6756.01 L48.2@8914.1,6741.89 ; X29.1@8718.79,7846.25 8745.72,7844.16 8786.68,7863.33 8879.63,7896.45 8877.9,7965.15 8877.9,8023.4 8970.8,8039.36 ; L52.2@8899.19,8344.32 8950.09,8107.82 8950.63,8106.26 8971.46,8046.08 ; 8944.15,6492.3 9250.71,6185.74 9477.1,6185.74 ; L8.2@2740.77,10972.47 2833.49,11011.74 2891.31,10993.42 2964.85,11066.96 2998.61,11066.96 3074.63,10990.94 X18.1@3132.65,10968.48 ; X18.1@3132.65,10968.48 3138.35,10962.79 X18.1@3148.3,10962.79 ; X18.1@3132.65,10968.48 3142.6,10968.48 X18.1@3148.3,10962.79 ; X18.1@3132.65,10968.48 X18.1@3148.3,10962.79 ; L32.2@3863.87,3625.31 3969.38,3519.8 L32.2@4071.87,3519.8 ; L32.2@3863.87,3625.31 3865.9,3621.22 3871.29,3610.35 L32.2@4071.87,3519.8 ; L48.2@8914.1,6741.89 8838.86,6551.35 L48.2@8914.1,6741.89
  Top Layer w118.11: 172.79,7262.22 468.61,7262.22 823.28,7098.3 876.17,7096.84 ; 426.97,9084.79 549.6,9084.79 855.67,8778.72 890.28,8708.87 946.25,8628.86 L16.2@915.63,8503.09 ; 676.91,5388.54 781.57,5493.2 1236.88,5493.2 1325.29,5493.9 1341.12,5481.5 1350.47,5474.18 1487.4,5366.99 L24.2@1509.7,5319.2 ; 1300.64,10632.92 1606.9,10326.66 1606.9,10063.86 1614.19,10047.09 L12.2@1528.46,9807.53 ; 1658,4025.37 1785.26,4152.64 2227.8,4152.64 2302.83,4227.68 2364.49,4274.8 2369.72,4234.52 L28.2@2609.09,4149.24 ; L8.2@2640.71,10916.08 2630.87,10925.92 2782.13,11048.19 2784.2,11050.26 2810.52,11050.26 2879.78,11119.53 2879.78,11125.92 2870.36,11135.34 2918.5,11183.47 2918.5,11674.08 2784.71,11807.87 ; 3227.06,3112.71 3621.37,3507.01 3792.42,3617.79 3857.6,3625.31 3865.9,3621.22 L32.2@4071.87,3519.8 ; L4.2@4120.12,11528.73 4523.99,11739.51 4566.54,11788.62 4583.02,12301.88 ; 5090.34,2816.04 5090.34,3098.77 5399.33,3407.76 5437.54,3429.38 5476.53,3483.97 5703.85,3527.27 5703.85,3534.53 5701.27,3537.11 5690.94,3537.11 L36.2@5690.14,3536.32 ; 6913.76,3223.9 6872.1,3265.56 6872.1,3613.35 7020.03,3761.28 7020.03,3921.96 7014.21,3930.96 7041.03,4045.99 L40.2@7192.3,4136.34 ; L44.2@8293.85,5269.13 8293.85,5267.41 8290.13,5263.69 8179.49,5034.81 8169.74,5020.88 8163.67,5014.8 8163.67,4687.35 8463.25,4387.76 ; L52.2@8899.99,8340.45 8899.19,8341.24 8899.19,8344.32 8932.11,8122.53 L52.2@8950.63,8106.26 ; 8971.46,8046.08 8970.8,8039.36 8967.41,8004.88 9237.91,7901.37 9649.43,7901.37
  Bottom Layer w9.84: 5188.38,3780.74 5188.98,3763.52 X25.1@5195.94,3717.52
  Bottom Layer w39.37: X21.3@1284.97,7249.87 1372.67,7249.87 1445.57,7322.78 1744.07,7322.78 1966.45,7545.15 2509.11,7545.15 2578.82,7475.44 2578.82,7451.69 C37.1@2630.67,7399.84 ; X20.3@1442.84,8649.06 1688.09,8649.06 1766.06,8571.1 2469.74,8571.1 2702.52,8338.32 C36.1@2748.41,8275.31 ; X22.3@1669.77,5909.8 1796.2,6036.24 1921.94,6036.24 2480.38,6594.68 2774.41,6594.68 2781.49,6587.59 C38.1@2849.03,6548.66 ; X18.3@3239.81,10766.54 3351.83,10654.52 3351.83,10550.99 3852.81,10050 3852.81,9968.23 3916.76,9904.28 3916.76,9650.09 C34.1@3888.51,9577.43 ; X17.3@4597.62,11152.69 4597.62,11089.05 4694.91,10991.76 4694.91,10687.92 4898.12,10484.71 4898.12,9964.07 C33.1@4739.69,9805.64
  Bottom Layer w59.06: X21.1@1068.73,7238.54 1114.47,7248.93 1132.55,7249.87 X21.3@1284.97,7249.87 ; X20.1@1239.36,8723.12 1283.33,8708.79 1299.31,8702.97 X20.3@1442.84,8649.06 ; X22.1@1473.52,5818.29 1520.16,5827.64 1535.57,5834.83 1596.66,5895.92 X22.3@1669.77,5909.8 ; X19.1@1981.84,10036.99 2019.29,10009.38 2031.89,9997.63 2087.59,9941.93 X19.3@2140.21,9889.32 2202.21,9827.31 2309.42,9827.31 2510.14,9626.59 2786.44,9626.59 3180.2,9232.83 3180.2,9158.76 3180.4,9158.55 3180.4,9128.34 3186.97,9121.78 C35.1@3186.97,9038.82 ; X23.1@2389.47,4641.99 2417.08,4679.44 2428.83,4692.04 2484.53,4747.74 X23.3@2537.15,4800.36 2591.5,4854.71 2591.5,4932.4 2872.37,5213.27 2872.37,5528.02 3191.46,5847.12 C39.1@3387.64,5847.12 ; X18.1@3148.3,10962.79 3154.1,10957.18 X18.1@3154.32,10944.53 ; X18.3@3239.81,10766.54 3197.72,10849.99 3178.54,10889.95 3158.53,10932.85 X18.1@3156.03,10940.17 ; X24.1@3703.35,3899.51 3729.71,3939.1 3735.53,3955.08 3753.89,4016.97 X24.3@3777.41,4102.99 3777.41,4346.25 3853.56,4422.41 3853.56,5103.7 4095.86,5345.99 4110.29,5345.99 C40.1@4160.48,5396.19 ; X17.1@4590.06,11369.1 X17.3@4597.62,11152.69 ; C41.1@5046.31,5280.98 4979.41,5214.08 4979.41,5182.88 4898.51,5101.99 4898.51,4717.26 4898.51,4619.96 5114.18,4404.29 5114.18,4146.64 5161.6,4099.21 5161.6,4034.35 5188.38,4007.56 X25.3@5188.38,3933.92 5188.38,3780.74 ; C48.1@5615.67,9690.43 5671.01,9745.77 5731.49,9745.77 5927.81,9942.08 5927.81,10674.99 5998.75,10745.93 X32.3@5998.75,10993.47 6023.88,11085.96 6040.63,11141.37 6046.44,11157.36 X32.1@6072.81,11196.94 ; C42.1@5897.49,5509.18 5846.03,5457.72 5846.03,5146.08 6377.64,4614.47 6377.64,4478.78 X26.3@6536.35,4320.07 6559.58,4296.84 6618.51,4170.46 X26.1@6627.86,4123.82 ; C47.1@6378.67,9259.18 6553.16,9259.18 6893.33,9599.35 6893.33,9737.22 6985.44,9829.33 6985.44,9936.48 7211.34,10162.38 7211.34,10207.51 X31.3@7229.17,10305.94 7337.48,10414.26 7349.23,10426.86 X31.1@7376.84,10464.31 ; C43.1@6599.03,6047.79 6645.33,6001.5 6645.33,5787.76 6928.38,5504.7 7248.94,5504.7 7516.44,5237.2 7549.82,5237.2 X27.3@7645.79,5197.3 7698.41,5144.68 7754.11,5088.98 7766.71,5077.23 X27.1@7804.16,5049.62 ; C46.1@6927.12,8557.64 6998.11,8557.64 7007.24,8548.51 7341.44,8548.51 7854.96,9062.02 7981.76,9062.02 X30.3@8116.23,9196.5 8196.98,9247.39 8250.43,9271.47 8265.84,9278.66 X30.1@8312.48,9288.01 ; C44.1@7040.12,6810.79 7108.12,6752.2 7341.96,6518.36 8005.07,6518.36 8084.61,6438.82 X28.3@8345.17,6438.82 8487.02,6380.56 8502.9,6374.47 X28.1@8547.33,6361.22 ; C45.1@7155.33,7696.62 7165.17,7696.62 7165.95,7697.4 7168.96,7697.4 7168.93,7697.35 7187.63,7641.33 7421.51,7565.99 7453.85,7555.05 7453.88,7555.11 7816.2,7555.11 8007.28,7746.19 8352.04,7746.19 8429.51,7823.66 X29.3@8502.39,7838.69 8655.57,7838.69 8672.78,7839.29 X29.1@8718.79,7846.25 ; X18.1@3154.32,10944.53 3155.12,10942.12 X18.1@3156.03,10940.17 ; X18.1@3154.32,10944.53 3154.37,10941.77 X18.1@3156.03,10940.17
  other v1: 4066.23,2791.34 4125.28,2791.34 4182.37,2791.34 4066.23,2838.58 4125.28,2838.58 4184.34,2838.58 5989.46,2874.02 6040.64,2874.02 6089.85,2875.98 5989.46,2919.29 6040.64,2919.29 6089.85,2919.29 2391.03,3385.83 2450.09,3385.83 2391.03,3433.07 2450.09,3435.04 2391.03,3478.35 2450.09,3478.35 7788.67,3728.35 7835.91,3728.35 7883.16,3728.35 7788.67,3773.62 7835.91,3773.62 7883.16,3773.62 1074.1,4633.86 1026.86,4635.83 1026.86,4685.04 1074.1,4685.04 1026.86,4732.28 1074.1,4732.28 9017.02,5082.68 9066.23,5082.68 9017.02,5135.83 9066.23,5135.83 9017.02,5188.98 9066.23,5188.98 205.99,6291.34 247.33,6291.34 204.02,6340.55 247.33,6342.52 204.02,6389.76 247.33,6389.76 9605.6,6818.9 9652.84,6818.9 9605.6,6877.95 9652.84,6877.95 9605.6,6933.07 9652.84,6933.07 105.6,8167.32 150.87,8167.32 103.63,8218.5 148.91,8218.5 103.63,8271.65 148.91,8271.65 9499.3,8759.84 9544.57,8759.84 9499.3,8809.06 9544.57,8809.06 9499.3,8862.2 9544.57,8862.2 767.02,9978.35 822.13,9978.35 767.02,10029.53 822.13,10029.53 767.02,10078.74 822.13,10078.74 8715.83,10381.89 8757.17,10381.89 8715.83,10429.13 8757.17,10429.13 8715.83,10476.38 8757.17,10476.38 1914.65,11287.4 1961.9,11287.4 1914.65,11328.74 1961.9,11328.74 1914.65,11372.05 1961.9,11372.05 7282.76,11655.51 7333.94,11655.51 7387.09,11655.51 7282.76,11696.85 7333.94,11698.82 7387.09,11698.82 3591.82,12120.08 3641.03,12120.08 3591.82,12173.23 3641.03,12173.23 3591.82,12218.5 3641.03,12218.5 5461.9,12275.59 5518.98,12275.59 5580.01,12275.59 5461.9,12320.87 5518.98,12320.87 5580.01,12320.87
pads on no net: C1. C2. C3. C4. C5. C6. C7. C8. C9. C10. C11. C12. C13. C14. C15. C16. C33. C34. C35. C36. C37. C38. C39. C40. C41. C42. C43. C44. C45. C46. C47. C48. X1. X2. X3. X4. X5. X6. X7. X8. X9. X10. X11. X12. X13. X14. X15. X16. X17. X18. X19. X20. X21. X22. X23. X24. X25. X26. X27. X28. X29. X30. X31. X32.

## Polygon pours and split planes (outlines as drawn)
$1N6128 on Top Layer "$1N6128_L01_P193" (solid, remove dead copper, pour order 193): 5247.49,9679.86 4946.24,9739.78 4992.4,9971.85 5293.65,9911.92
$1N6128 on Top Layer "$1N6128_L01_P190" (solid, remove dead copper, pour order 190): 4995.22,9095.54 5066.36,9453.22 5352.56,9396.29 5281.41,9038.61
$1N6121 on Top Layer "$1N6121_L01_P189" (solid, remove dead copper, pour order 189): 6013.64,9352.35 5755.23,9525.01 5889.01,9725.22 6147.41,9552.56
$1N6121 on Top Layer "$1N6121_L01_P186" (solid, remove dead copper, pour order 186): 5583.18,8952.19 5785.53,9255.03 6024.36,9095.45 5822.01,8792.61
$1N6115 on Top Layer "$1N6115_L01_P185" (solid, remove dead copper, pour order 185): 6642.24,8785.98 6464.72,9051.66 6667.71,9187.3 6845.23,8921.61
$1N6115 on Top Layer "$1N6115_L01_P182" (solid, remove dead copper, pour order 182): 6063.37,8560.81 6368.57,8764.73 6526.65,8528.14 6221.46,8324.22
$1N6109 on Top Layer "$1N6109_L01_P181" (solid, remove dead copper, pour order 181): 6980.55,8027.24 6920.2,8330.67 7170,8380.36 7230.36,8076.93
$1N6109 on Top Layer "$1N6109_L01_P178" (solid, remove dead copper, pour order 178): 6389.59,7998.87 6734.7,8067.52 6781.45,7832.49 6436.34,7763.84
$1N5983 on Top Layer "$1N5983_L01_P177" (solid, remove dead copper, pour order 177): 7018.98,7181.01 7079.9,7487.25 7290.36,7445.38 7229.44,7139.14
$1N5983 on Top Layer "$1N5983_L01_P174" (solid, remove dead copper, pour order 174): 6416.96,7394.95 6764.45,7321.09 6715.86,7092.5 6368.38,7166.36
$1N5976 on Top Layer "$1N5976_L01_P173" (solid, remove dead copper, pour order 173): 6701.16,6409.58 6874.67,6669.25 7071.72,6537.58 6898.21,6277.91
$1N5976 on Top Layer "$1N5976_L01_P170" (solid, remove dead copper, pour order 170): 6303.22,6832.57 6580.68,6647.19 6416.25,6401.11 6138.8,6586.5
$1N5970 on Top Layer "$1N5970_L01_P169" (solid, remove dead copper, pour order 169): 6126.67,5806.47 6387.42,5980.69 6523.35,5777.26 6262.6,5603.03
$1N5970 on Top Layer "$1N5970_L01_P166" (solid, remove dead copper, pour order 166): 5921.4,6374.25 6114.68,6084.98 5868.12,5920.24 5674.84,6209.51
$1N5964 on Top Layer "$1N5964_L01_P165" (solid, remove dead copper, pour order 165): 5374.74,5460.84 5682.34,5522.03 5730.6,5279.42 5422.99,5218.23
$1N5964 on Top Layer "$1N5964_L01_P162" (solid, remove dead copper, pour order 162): 5386.87,6068.2 5452.6,5737.77 5175.15,5682.58 5109.42,6013.02
$1N5838 on Top Layer "$1N5838_L01_P161" (solid, remove dead copper, pour order 161): 4535.43,5448.65 4838.56,5388.36 4789.1,5139.68 4485.96,5199.97
$1N5838 on Top Layer "$1N5838_L01_P158" (solid, remove dead copper, pour order 158): 4781.43,5997.69 4716.3,5670.25 4447.91,5723.64 4513.04,6051.08
$1N5831 on Top Layer "$1N5831_L01_P157" (solid, remove dead copper, pour order 157): 3749.2,5743.82 4004.84,5573 3861.97,5359.17 3606.32,5529.98
$1N5831 on Top Layer "$1N5831_L01_P155" (solid, remove dead copper, pour order 155): 4188.14,6166.6 4000,5885.04 3759.37,6045.83 3947.5,6327.39
$1N5825 on Top Layer "$1N5825_L01_P153" (solid, remove dead copper, pour order 153): 3155.87,6327.75 3332.19,6063.88 3127.35,5927.01 2951.04,6190.89
$1N5825 on Top Layer "$1N5825_L01_P150" (solid, remove dead copper, pour order 150): 3723.22,6530.76 3446.2,6345.67 3287.83,6582.68 3564.85,6767.77
$1N5819 on Top Layer "$1N5819_L01_P149" (solid, remove dead copper, pour order 149): 2837.41,7080.75 2898.68,6772.73 2653.41,6723.94 2592.14,7031.96
$1N5819 on Top Layer "$1N5819_L01_P146" (solid, remove dead copper, pour order 146): 3424.97,7053.31 3099.09,6988.49 3044.12,7264.83 3370,7329.65
$1N5781 on Top Layer "$1N5781_L01_P145" (solid, remove dead copper, pour order 145): 2791.08,7888.07 2730.38,7596.25 2493.19,7645.58 2553.89,7937.4
$1N5781 on Top Layer "$1N5781_L01_P143" (solid, remove dead copper, pour order 143): 3359.92,7655.71 3041.09,7729.32 3107.65,8017.61 3426.48,7944
$1N5742 on Top Layer "$1N5742_L01_P141" (solid, remove dead copper, pour order 141): 3126.55,8649.22 2955.43,8393.12 2725.27,8546.91 2896.39,8803.01
$1N5742 on Top Layer "$1N5742_L01_P139" (solid, remove dead copper, pour order 139): 3687.97,8495.35 3519.9,8243.81 3236.57,8433.11 3404.65,8684.66
$1N5703 on Top Layer "$1N5703_L01_P136" (solid, remove dead copper, pour order 136): 3674.31,9260.6 3415.86,9087.91 3271.46,9304.01 3529.92,9476.71
$1N5703 on Top Layer "$1N5703_L01_P134" (solid, remove dead copper, pour order 134): 4104.6,8877.96 3872.13,8722.63 3699.16,8981.5 3931.63,9136.83
$1N2769 on Top Layer "$1N2769_L01_P133" (solid, remove dead copper, pour order 133): 4066.45,9787.37 4116.22,9537.17 4420.44,9597.69 4370.67,9847.88